# Altium PCB InterfaceBoard_PCB.PcbDoc (part 2 of 2)
Units mil, origin at the board's own origin, x right, y up, seen from the top; angles counter-clockwise.
Board outline 1629.92 x 1653.54 mil, 2 copper layers (Top Layer, Bottom Layer), stack 57 mil thick; 66 components, 48 nets, 226 pads, 80 vias.
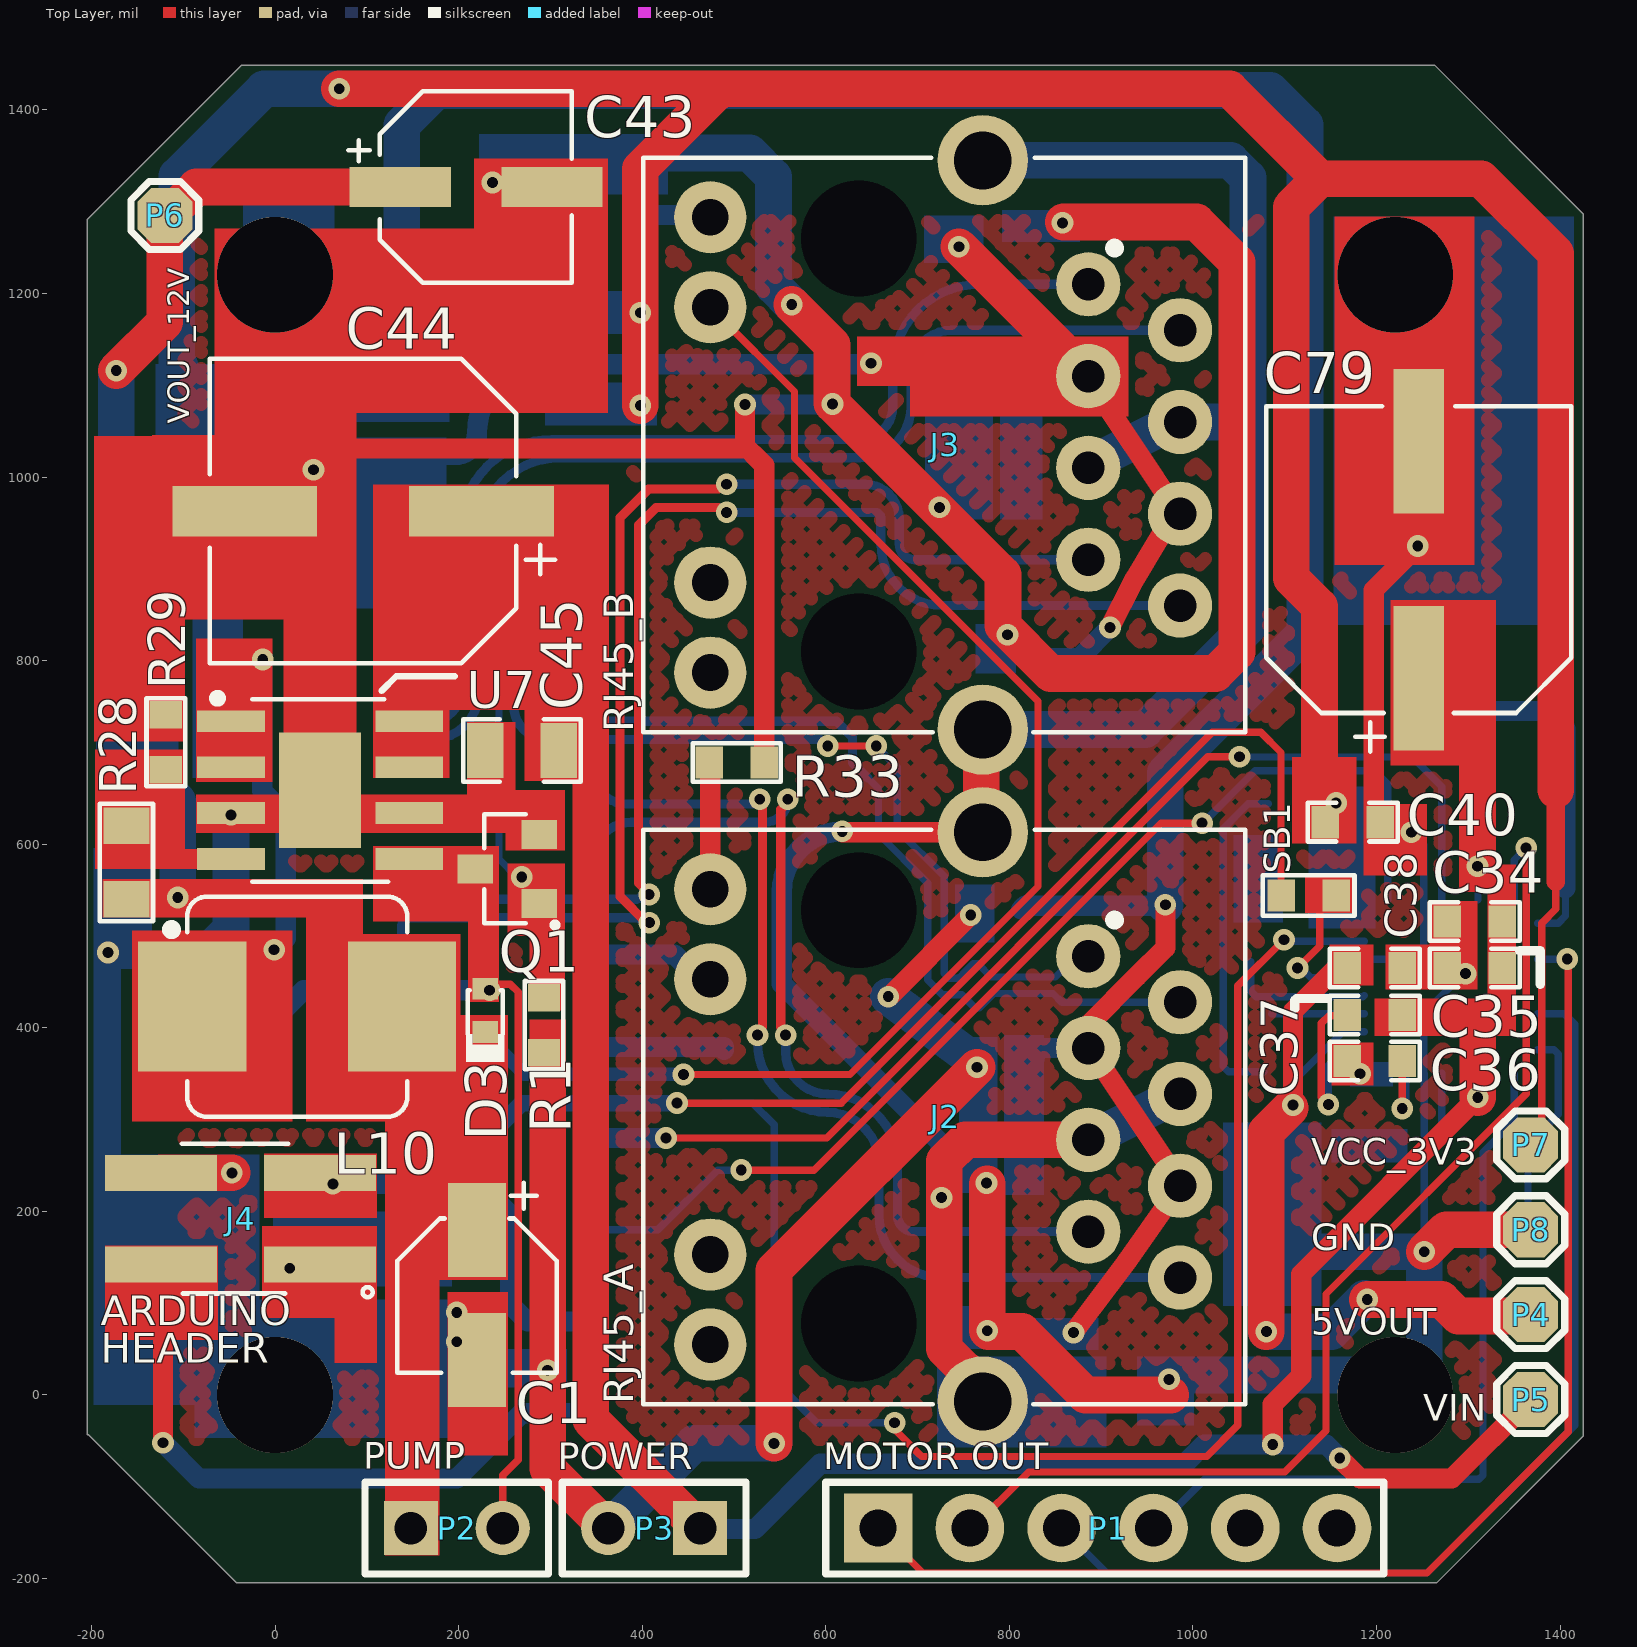
[diagram p0: Top Layer view]

## Via types
v1: diameter 23.62, hole 11.81, Top Layer to Bottom Layer, tented both sides, 74 vias
v2: diameter 125.98, hole 125.98, Top Layer to Bottom Layer, 4 vias
v3: diameter 23.62, hole 11.81, Top Layer to Bottom Layer, 2 vias

## Nets (pads, with @x,y where several pads share a name; then routed paths per layer and width w, separated by ;. In a path a pad name is that pad's centre, name@x,y a point inside that pad or via, vN(x,y) a via of type N, cw(c..) or ccw(c..) an arc to the next point about the centre after c; other vN are vias at no path point) (continued)
TXB_N: (continued)
  Bottom Layer w10: J1.12 138,699 cw(c153,699) 153,714 170,714 ccw(c170,766) 222,766 222,933 cw(c310,933) 236.7,981.69 cw(c310,933) 310,1021 637,1021 ccw(c637,1077) 693,1077 693,1116 cw(c737,1116) 737,1160 753,1160 811,1160 J3.2
TXB_P: C49.1 J1.10 J3.1 R31.1 | length 1152.6
  Bottom Layer w10: J1.10 138,749 ccw(c153,749) 153,734 170,734 ccw(c170,766) 202,766 202,941.28 cw(c301.72,941.28) 224.13,1003.93 cw(c301.72,941.28) 301.72,1041 637,1041 ccw(c637,1077) 673,1077 673,1116 cw(c767,1116) 767,1210 810,1210 J3.1 ; C49.1@810,1207 C49.1
UART_IO: J1.17 SB5.1 | length 144.1
  Bottom Layer w22: J1.17 347.66,379 SB5.1@488.98,379 ; SB5.1@488,377 SB5.1@488.98,376.03
VCC_3V3: C2.2 C40.1 J1.1 J1.3 P7.1 R21.1 R22.1 U1.2 U1.4 U3.16 | length 3928.9
  Top Layer w8: P7.1 1380,284.5 1380,514 1395.44,529.44 1395.44,559
  Top Layer w20: 1395.44,559 1395.44,659
  Top Layer w40: v1(70,1423) 1040,1423 1138,1325 ; v1(398,1078) v1(398,1179) 398,1336 480,1418 ; 1143,648 1138,653 1138,859 1107,890 1107,1294 1138,1325 ; 1395.44,659 1395.44,1243.56 1314,1325 1138,1325
  Bottom Layer w40: C2.2 -103.5,1095.5 -103.5,1120.43 -107,1123.93 -107,1328 -12,1423 v1(70,1423)
  other v1: 1156,645
VDD_5V: J1.22 J4.1
  other v1: 16,138
VDDTXRX1: C56.1 J1.2 J1.4 J2.3 J2.6 R30.2 R32.2 R35.2 R37.2 | length 2907.4
  Top Layer w22: v1(869.94,67.94) 928.34,145.98 ccw(c886,177.92) 929.41,147.45 J2.6@979.05,218.04 ; J2.3@883.48,380 J2.3@883.48,394 ; J2.3@887.19,404.1 939.04,455.95 970,486.93 v1(970,534) ; J2.3@888.48,376.92 979.16,240.91 988.09,239.13 988.23,239.1 J2.6@989.48,238.85
  Bottom Layer w22: R30.2 817,533 968.56,533 969.56,534 v1(970,534) ; R32.2@818,368 818,377.92 J2.3
  Bottom Layer w40: J1.2 138,1383.57 175.68,1421.25 1084.32,1421.25 1122,1383.57 1122,830 970,678 v1(970,534) ; R32.2@818,368 R32.2@818.96,368.96
VDDTXRX2: C57.1 J1.6 J1.8 J3.3 J3.6 R31.2 R34.2 R36.2 R38.2 | length 1303.3
  Top Layer w22: J3.3@885.62,1108.08 J3.6@984.08,960.38 ; v1(909.7,836.19) 935.22,886.48 cw(c982.52,862.48) 936.98,889.68 J3.6@980.59,962.87
  Top Layer w40: v1(745,1251) 858.38,1137.62 ; 850.73,1124 858.98,1115.75 880.24,1115.75 J3.3 ; J3.3@861.86,1135.13 J3.3@873.09,1123.9
  Bottom Layer w22: 135,1024 196,1024 ccw(c196,1048) 220,1048 cw(c295,1048) 295,1123 647.86,1123 648.86,1124 v1(649.3,1124) ; 725,1255 724.5,1254.5 724.5,1252.78 726.28,1251 v1(745,1251) ; R34.2 R34.2@814.5,1106.5 ; R36.2 876.51,803 v1(909.7,836.19) ; J3.3@882.5,1106.5 J3.3
  Bottom Layer w40: R34.2@814.5,1106.5 J3.3@882.5,1106.5
VIN: C34.1 C35.1 C37.2 C44.1 C45.1 C79.1 P3.1 P5.1 U3.3 U3.22 U7.7 U7.8 | length 2746.4
  Top Layer w22: v3(1087,-54) 1087,-10 1118,21 1118,131.78 v1(1310.4,324.18) ; v3(1159.98,-68.82) 1182.16,-91 1282,-91 P5.1
  Top Layer w40: 155,718 ccw(c156,718) 156,717 ; C45.1@309,692 C45.1 ; 344,668.57 344,-27 P3.1@463,-146 ; 1305.03,411.5 1310.4,406.12 v1(1310.4,324.18) ; v1(1310,576) 1310,829
  Bottom Layer w8: v1(1310,576) 1310.53,575.47 U3.22 ; v1(1310.4,324.18) 1310.4,323.93 1310.53,324.06 U3.3
  Bottom Layer w22: P3.1@463,-146 523,-146 594,-75 991,-75 1012,-54 v3(1087,-54) 1145.16,-54 v3(1159.98,-68.82)
VOUT_12V: C1.1 C43.1 D3.2 L10.2 P2.1 P6.1 R28.1 U1.3 | length 921.2
  Top Layer w40: v1(-173,1116) -120,1169 P6.1 -116.72,1285 -85.72,1316 C43.1
  Bottom Layer w40: -174,848 -173,849 v1(-173,1116) ; U1.3 -147.48,712.38 -147.48,688.48 -106,647 v1(-106,542)
pads on no net: J2.L1 J2.L2 J2.MH3 J2.MH4 J3.L1 J3.L2 J3.MH3 J3.MH4 P1.5 P1.6 U3.2 U3.4 U3.18 U3.21 U3.23 U3.26 U3.28 U3.29 U3.31

## Polygon pours and split planes (outlines as drawn)
no net on Top Layer "Polygon_1" (hatched 45Degree grid 20 track 15, remove dead copper, pour order 1): -99,-42 cw(c-105,-42) -105,-48 1323,-48 ccw(c1323,-42) 1329,-42 1329,1273 ccw(c1323,1273) 1323,1279 -98,1279 cw(c-98.5,1279.5) -99,1279
GND on Bottom Layer "Polygon_2" (hatched 45Degree grid 20 track 15, remove dead copper, pour order 0): -99,-42 cw(c-105,-42) -105,-48 1323,-48 ccw(c1323,-42) 1329,-42 1329,1273 ccw(c1323,1273) 1323,1279 -98,1279 cw(c-98.5,1279.5) -99,1279

## Other copper
Top Layer:
  rectangle net NetSB1_1: 1122,525 1176,566
  rectangle net VDDTXRX2: 692,1066 930,1139
  rectangle net GND: 75,1070 250,1271
  rectangle net GND: 217,1070 363,1347
  rectangle net GND: -66,963 89,1271
  rectangle net VDDTXRX2: 634,1099 930,1153
  rectangle net VIN: 272,669 364,992
  rectangle net GND: 251,593 316,659
  rectangle net GND: 209,665 262,733
  rectangle net GND: 188,-66 254,112
  rectangle net #UART_RX: -185.23,60 -62.23,163
  rectangle net GND: 1154,904 1307,1284
  rectangle net GND: 277,376 317,409
  rectangle net RCS: 210,428 244,598
  rectangle net OPTO_IN: 253,500 307,579
  rectangle net VIN: 156,746 303,992
  rectangle net VIN: 107,748 190,992
  rectangle net VIN: 107,672 190,766
  rectangle net GND: 209,635 262,687
  rectangle net RCS: 107,516 227,598
  rectangle net OPTO_IN: 277,419 316,579
  rectangle net NetD2_2: -86,668 -3,824
  rectangle net GND: -86,612 277,654
  rectangle net VOUT_12V: 34,298 202,502
  rectangle net VIN: 1321,392 1352,578
  rectangle net VIN: 1290,548 1341,577
  rectangle net GND: 1186,566 1255,644
  rectangle net VDD_5V: 65,35 111,96
  rectangle net VOUT_12V: 120,-175 179,304
  rectangle net GND: 9,596 89,1046
  rectangle net GND: -134,845 50,1046
  rectangle net GND: -197,712 -98,1045
  rectangle net NetD2_2: -156,298 19,506
  rectangle net VOUT_12V: 34,453 96,550
  rectangle net VOUT_12V: -188,520 96,562
  rectangle net FB: -196,573 -98,703
  rectangle net VDD_5V: -14,84 111,184
  rectangle net #UART_TX: -12,193 111,263
  rectangle net VOUT_12V: 128,125 254,414
  rectangle net 5VOUT: 1149,446 1197,491
  rectangle net GND: 1210,442 1310,491
  rectangle net NetC36_2: 1151,337 1197,384
  rectangle net GND: 1258,482 1310,538
  rectangle net VIN: 1198,391 1352,432
  rectangle net VIN: 1215,686 1330,866
  rectangle net VCC_3V3: 1108,601 1178,695
Bottom Layer:
  rectangle net GND: 939,-33 1001,42
  rectangle net GND: -88,-47 212,104
  rectangle net GND: 1033,97 1140,297
  rectangle net GND_ETH: 721,-57 906,42
  rectangle net GND: 741,493 784,556
  rectangle net GND: 222,1308 428,1374
  rectangle net GND: 187,8 318,50
  rectangle net VDDTXRX1: 87,1060 190,1203
  rectangle net GND: 708,954 782,1124
  rectangle net VCC_3V3: 294,1056 416,1103
  rectangle net VCC_3V3: 294,1156 416,1203
  rectangle net VDDTXRX2: 84,857 187,1043
  rectangle net VDD_5V: -2,118 193,200
  rectangle net GND: -35,1021 46,1298
  rectangle net GND: 724,50 783,97
  rectangle net VDDTXRX1: 797,49 897,84
  region net GND: 787,390 745,390 745,220 787,220
  rectangle net VDDTXRX1: 794,218 838,392
  region net GND: 877,1291 792,1291 792,1256 877,1256
  rectangle net VDDTXRX2: 707,1233 772,1285
  rectangle net GND: 763,786 807,840
  rectangle net VDDTXRX2: 790,954 836,1127
  rectangle net GND: -198,-11 -17,262
  rectangle net GND: 20,672 65,1298
  rectangle net GND: -198,114 -168,482
  rectangle net VCC_3V3: -130,914 -47,1123
  rectangle net GND: -198,464 -134,596
  rectangle net VOUT_12V: -195,673 -105,873
  rectangle net VCC_3V3: -90,672 -35,1003
  rectangle net GND: 1153,839 1415,1284
  rectangle net VCC_3V3: 1126,508 1199,663
  rectangle net NetR22_2: 1044,515 1098,610
  rectangle net NetR18_1: 1151,253 1234,290
  rectangle net NetC36_2: 1171,336 1218,363

## Silkscreen, mask and mechanical layers (free items; w line width, h text height)
Top Overlay:
  lines w7: 116,767 132,783 196,783
  lines w10: 1111,421 1111,430 1113,432 1146,432 ; 1356,484 1378.5,484 1378.5,473 ; 1378.5,447.5 1378.5,474.76
  text "VOUT_12V" at -86,1058 h40 r90
  text "RJ45_B" at 401.09,722.01 h55 r90
  text "VCC_3V3" at 1129,241 h50
  text "GND" at 1129,148 h50
  text "ARDUINO" at -190,65 h55
  text "5VOUT" at 1129,56 h50
  text "HEADER" at -190,24 h55
  text "RJ45_A" at 401.09,-10.07 h55 r90
  text "VIN" at 1251,-38 h50
  text "PUMP" at 96,-90.46 h50
  text "POWER" at 308,-91 h50
  text "MOTOR OUT" at 597,-91 h50
Bottom Overlay:
  text "& >> 10pF" at 1257.58,1383.23 h80
  text "# >> 49K9" at 1262,1297.06 h80
  text "&" at 876,1260 h60
  text "INTERFACING HEADER" at 367,1253 h55
  text "#" at 720,1194 h60
  text "#" at 870,1137 h60
  text "&" at 722.09,1086.76 h60
  text "#" at 835,1020 h60 r90
  text "&" at 728.09,895.76 h60
  text "&" at 753.09,786.76 h60
  text "#" at 819,776 h60 r180
  text "#" at 842,561 h60 r180
  text "&" at 732.09,454.76 h60
  text "#" at 845,409 h60 r270
  text "&" at 734.09,347.76 h60
  text "#" at 872,215 h60
  text "&" at 732.09,165.76 h60
  text "&" at 733,53 h60
  text "#" at 873,53 h60
Mechanical 2:
  lines w10: -203.18,-43.35 -203.18,1281.82 ; -203.18,-43.35 -203.18,1281.82 ; -203.18,-43.35 -41.8,-204.72 1265.28,-204.72 1425.2,-44.8 ; -203.18,1281.82 -36.18,1448.82 1263.11,1448.82 1425.2,1286.73 ; 1425.2,-44.8 1425.2,1286.73 ; 1425.2,-44.8 1425.2,1286.73

## Dimensions
-36.18,1448.82 to -41.8,-204.72 on Mechanical 1
-203.18,1281.82 to 1425.2,1286.73 on Mechanical 1